# Altium PCB PB.PcbDoc
Units mil, origin at the board's own origin, x right, y up, seen from the top; angles counter-clockwise.
Board outline 1181.1 x 787.4 mil, 2 copper layers (Top Layer, Bottom Layer); 2 components, 5 nets, 16 pads, 0 vias.
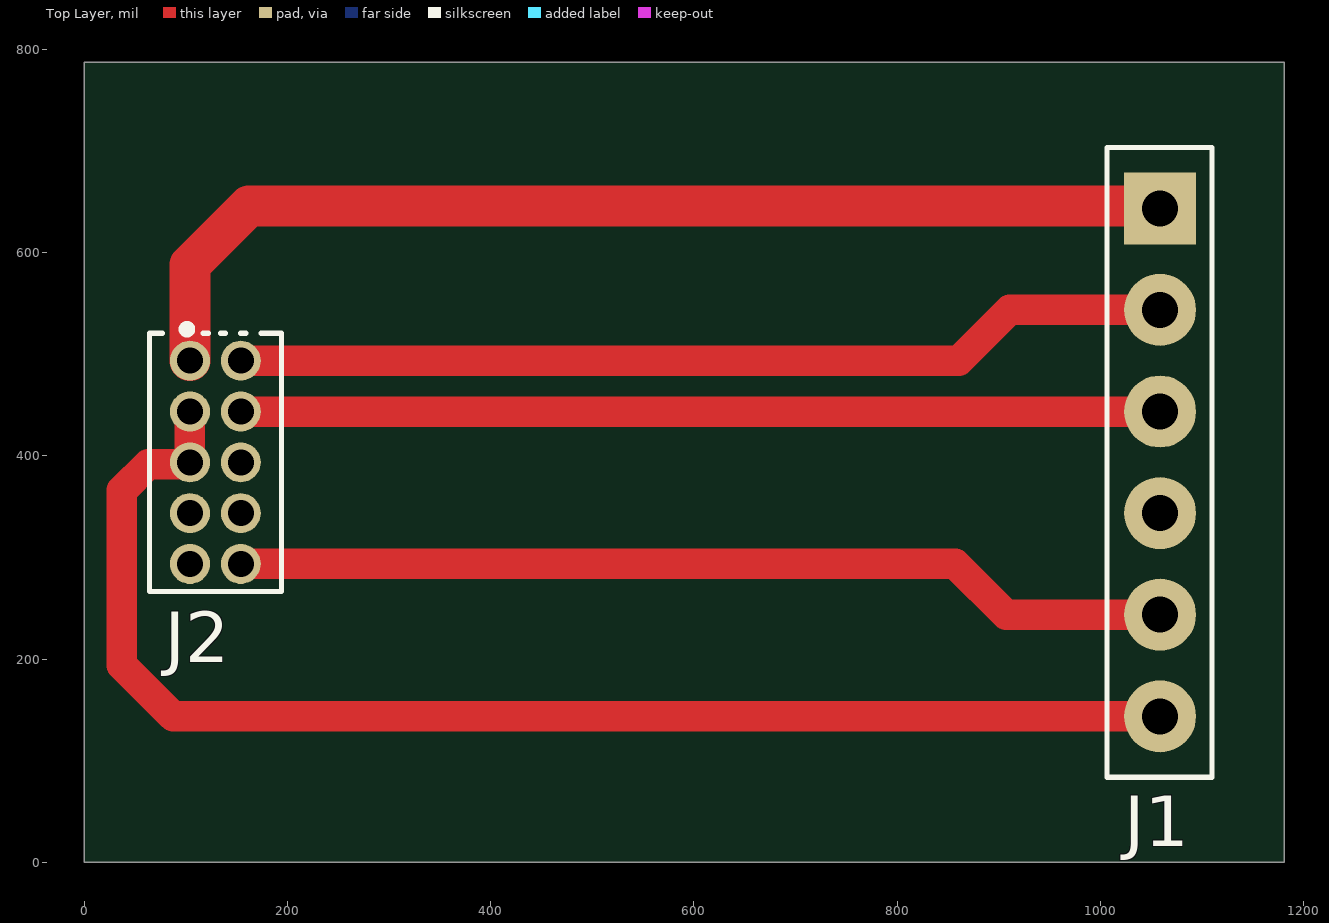
[diagram p0: Top Layer view]
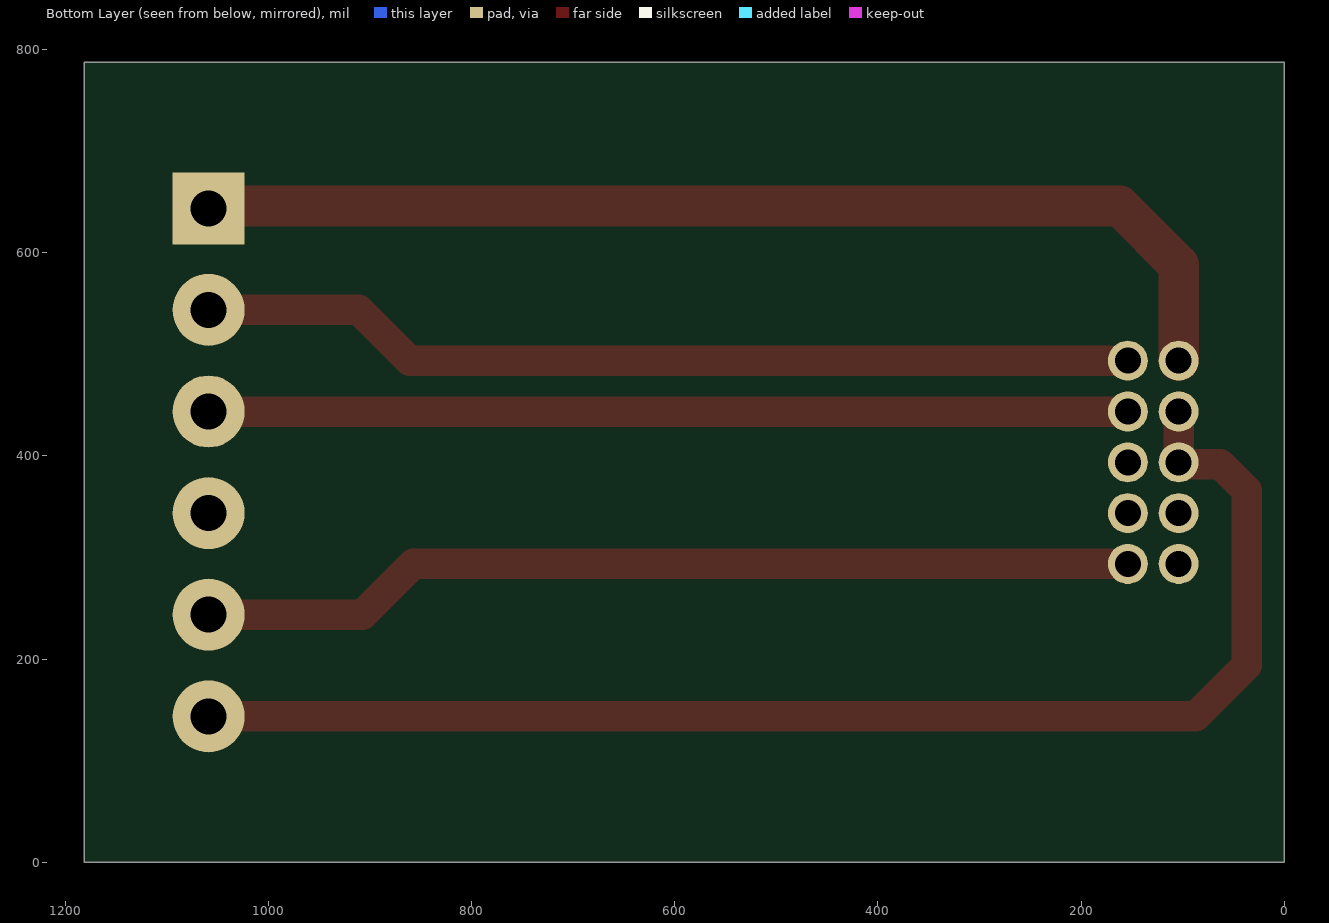
[diagram p1: Bottom Layer view, seen from below]

## Layer stack, top to bottom
Top Solder: solder mask 0.4, Solder Resist, Dk 3.5
Top Layer: signal copper 1.4
Dielectric 1: dielectric 12.6, FR-4, Dk 4.8
Bottom Layer: signal copper 1.4
Bottom Solder: solder mask 0.4, Solder Resist, Dk 3.5

## Board outline
0,0 0,787.4 1181.1,787.4 1181.1,0

## Design rules (kind name [scope] priority, off if disabled: settings)
Clearance [All] p1: gap=10 ignorepadtopadclearanceinfootprint=FALSE except(0: Arc-Hole Track-Hole SMDPad-Hole THPad-Hole Via-Hole Fill-Hole Poly-Hole Region-Hole Text-Hole)
PolygonConnect [All] p1: connectstyle=Relief reliefconductorwidth=10 reliefentries=4 polygonreliefangle="90 Angle" airgapwidth=10
RoutingVias [All] p1: holewidth=28 width=50 viastyle="Through Hole" minholewidth=28 minwidth=50 maxholewidth=28 maxwidth=50
SilkToSilkClearance [All] p1: silktosilkclearance=0
SilkToSolderMaskClearance [IsPad] p1: minsilkscreentomaskgap=0 clearancetoexposedcopper=TRUE
SolderMaskExpansion [All] p1: expansion=0 istentingtop=FALSE
Width [All] p1: maxlimit=50 minlimit=10 preferedwidth=10
28 further rules are at their usual default settings.

## Components (designator, comment, footprint, x,y, rotation, side; value= is the part's Value field where it differs from the comment)
J1 "C40877" HDR_F_1X6 1058.78,393.7 r270 top locked
J2 "2x10 Header" "10Pin 1.27mm" 129,393.7 r270 top locked

## Footprints (in the part's own frame and the unit in brackets; to place one, negate y for a bottom-side part, rotate by r counter-clockwise, add the part's x,y. Pads: shape width x height; smd on the part's side, far side on the other; paste and mask are expansions set on the pad)
"10Pin 1.27mm" [mm] "Male header 1.27mm 5x2 10-Pin"
  round 1 hole 0.65: 1(-2.54,-0.635) 2(-2.54,0.635) 3(-1.27,-0.635) 4(-1.27,0.635) 5(0,-0.635) 6(0,0.635) 7(1.27,-0.635) 8(1.27,0.635) 9(2.54,-0.635) 10(2.54,0.635)
  silkscreen extent -3.41,-1.65 3.23,1.65, body extent -3.18,-1.7 3.17,1.7, height 5.31
HDR_F_1X6 [mm]
  rect 1.8x1.8 hole 0.9: 1(-6.35,0)
  round 1.8 hole 0.9: 2(-3.81,0) 3(-1.27,0) 4(1.27,0) 5(3.81,0) 6(6.35,0)
  silkscreen extent -7.87,-1.32 7.87,1.3, body extent -7.87,-1.27 7.87,1.27, height 8.6

## Part data
J1: "2.54mm Straight 1x6P 6 1 Straight,P=2.54mm Female Headers ROHS", Manufacturer=BOOMELE, ComponentLink1Description=LCSC, ComponentLink1URL=https://lcsc.com/product-detail/span-style-background-color-ff0-Female-span-Headers_BOOMELE-Boom-Precision-Elec-C40877_C40877.html, LCSC Part Number=C40877, Manufacturer Part Number=C40877
J2: library part DW127R-22-10-23, "1A Straight Square Pins 1mm 3mm 2 10 2.3mm 1.27mm 1.27mm 2x5P Straight,P=1.27mm Pin Headers ROHS", LCSC Part Number=C2935953, Manufacturer=DEALON, Package=Custom, ComponentLink1Description=LCSC, ComponentLink1URL=https://lcsc.com/product-detail/span-style-background-color-ff0-Pin-span-Headers_DEALON-DW127R-22-10-23_C2935953.html, Manufacturer Part Number=DW127R-22-10-23

## Nets (pads, with @x,y where several pads share a name; then routed paths per layer and width w, separated by ;. In a path a pad name is that pad's centre, name@x,y a point inside that pad or via, vN(x,y) a via of type N, cw(c..) or ccw(c..) an arc to the next point about the centre after c; other vN are vias at no path point)
3V3: J1.1 J2.1 | length 1074.1
  Top Layer w15: J1.1@1056.48,646 J1.1
  Top Layer w40: J2.1 104,588 162,646 J1.1@1056.48,646
GND: J1.6 J2.3 J2.5 | length 1343.1
  Top Layer w30: J2.3 J2.5 102.21,391.91 62.91,391.91 37,366 37,194 87.3,143.7 J1.6
RST_: J1.5 J2.10 | length 925.5
  Top Layer w30: J2.10 857.3,293.7 907.3,243.7 J1.5
SWDCLK_: J1.3 J2.4 | length 904.8
  Top Layer w30: J2.4 J1.3
SWDIO_: J1.2 J2.2 | length 925.7
  Top Layer w15: J1.2@1058.48,544 J1.2
  Top Layer w30: J2.2 860.7,493.7 911,544 J1.2@1058.48,544
pads on no net: J1.4 J2.6 J2.7 J2.8 J2.9

## Silkscreen, mask and mechanical layers (free items; w line width, h text height)
Mechanical 2:
  the board outline again, w10